# Altium PCB Driver_S_Comm.PcbDoc (part 5 of 5)
Units mm, origin at the board's own origin, x right, y up, seen from the top; angles counter-clockwise.
Board outline 200.2 x 290.2 mm, 2 copper layers (Top Layer, Bottom Layer), stack 1.371 mm thick; 518 components, 197 nets, 1403 pads, 323 vias.
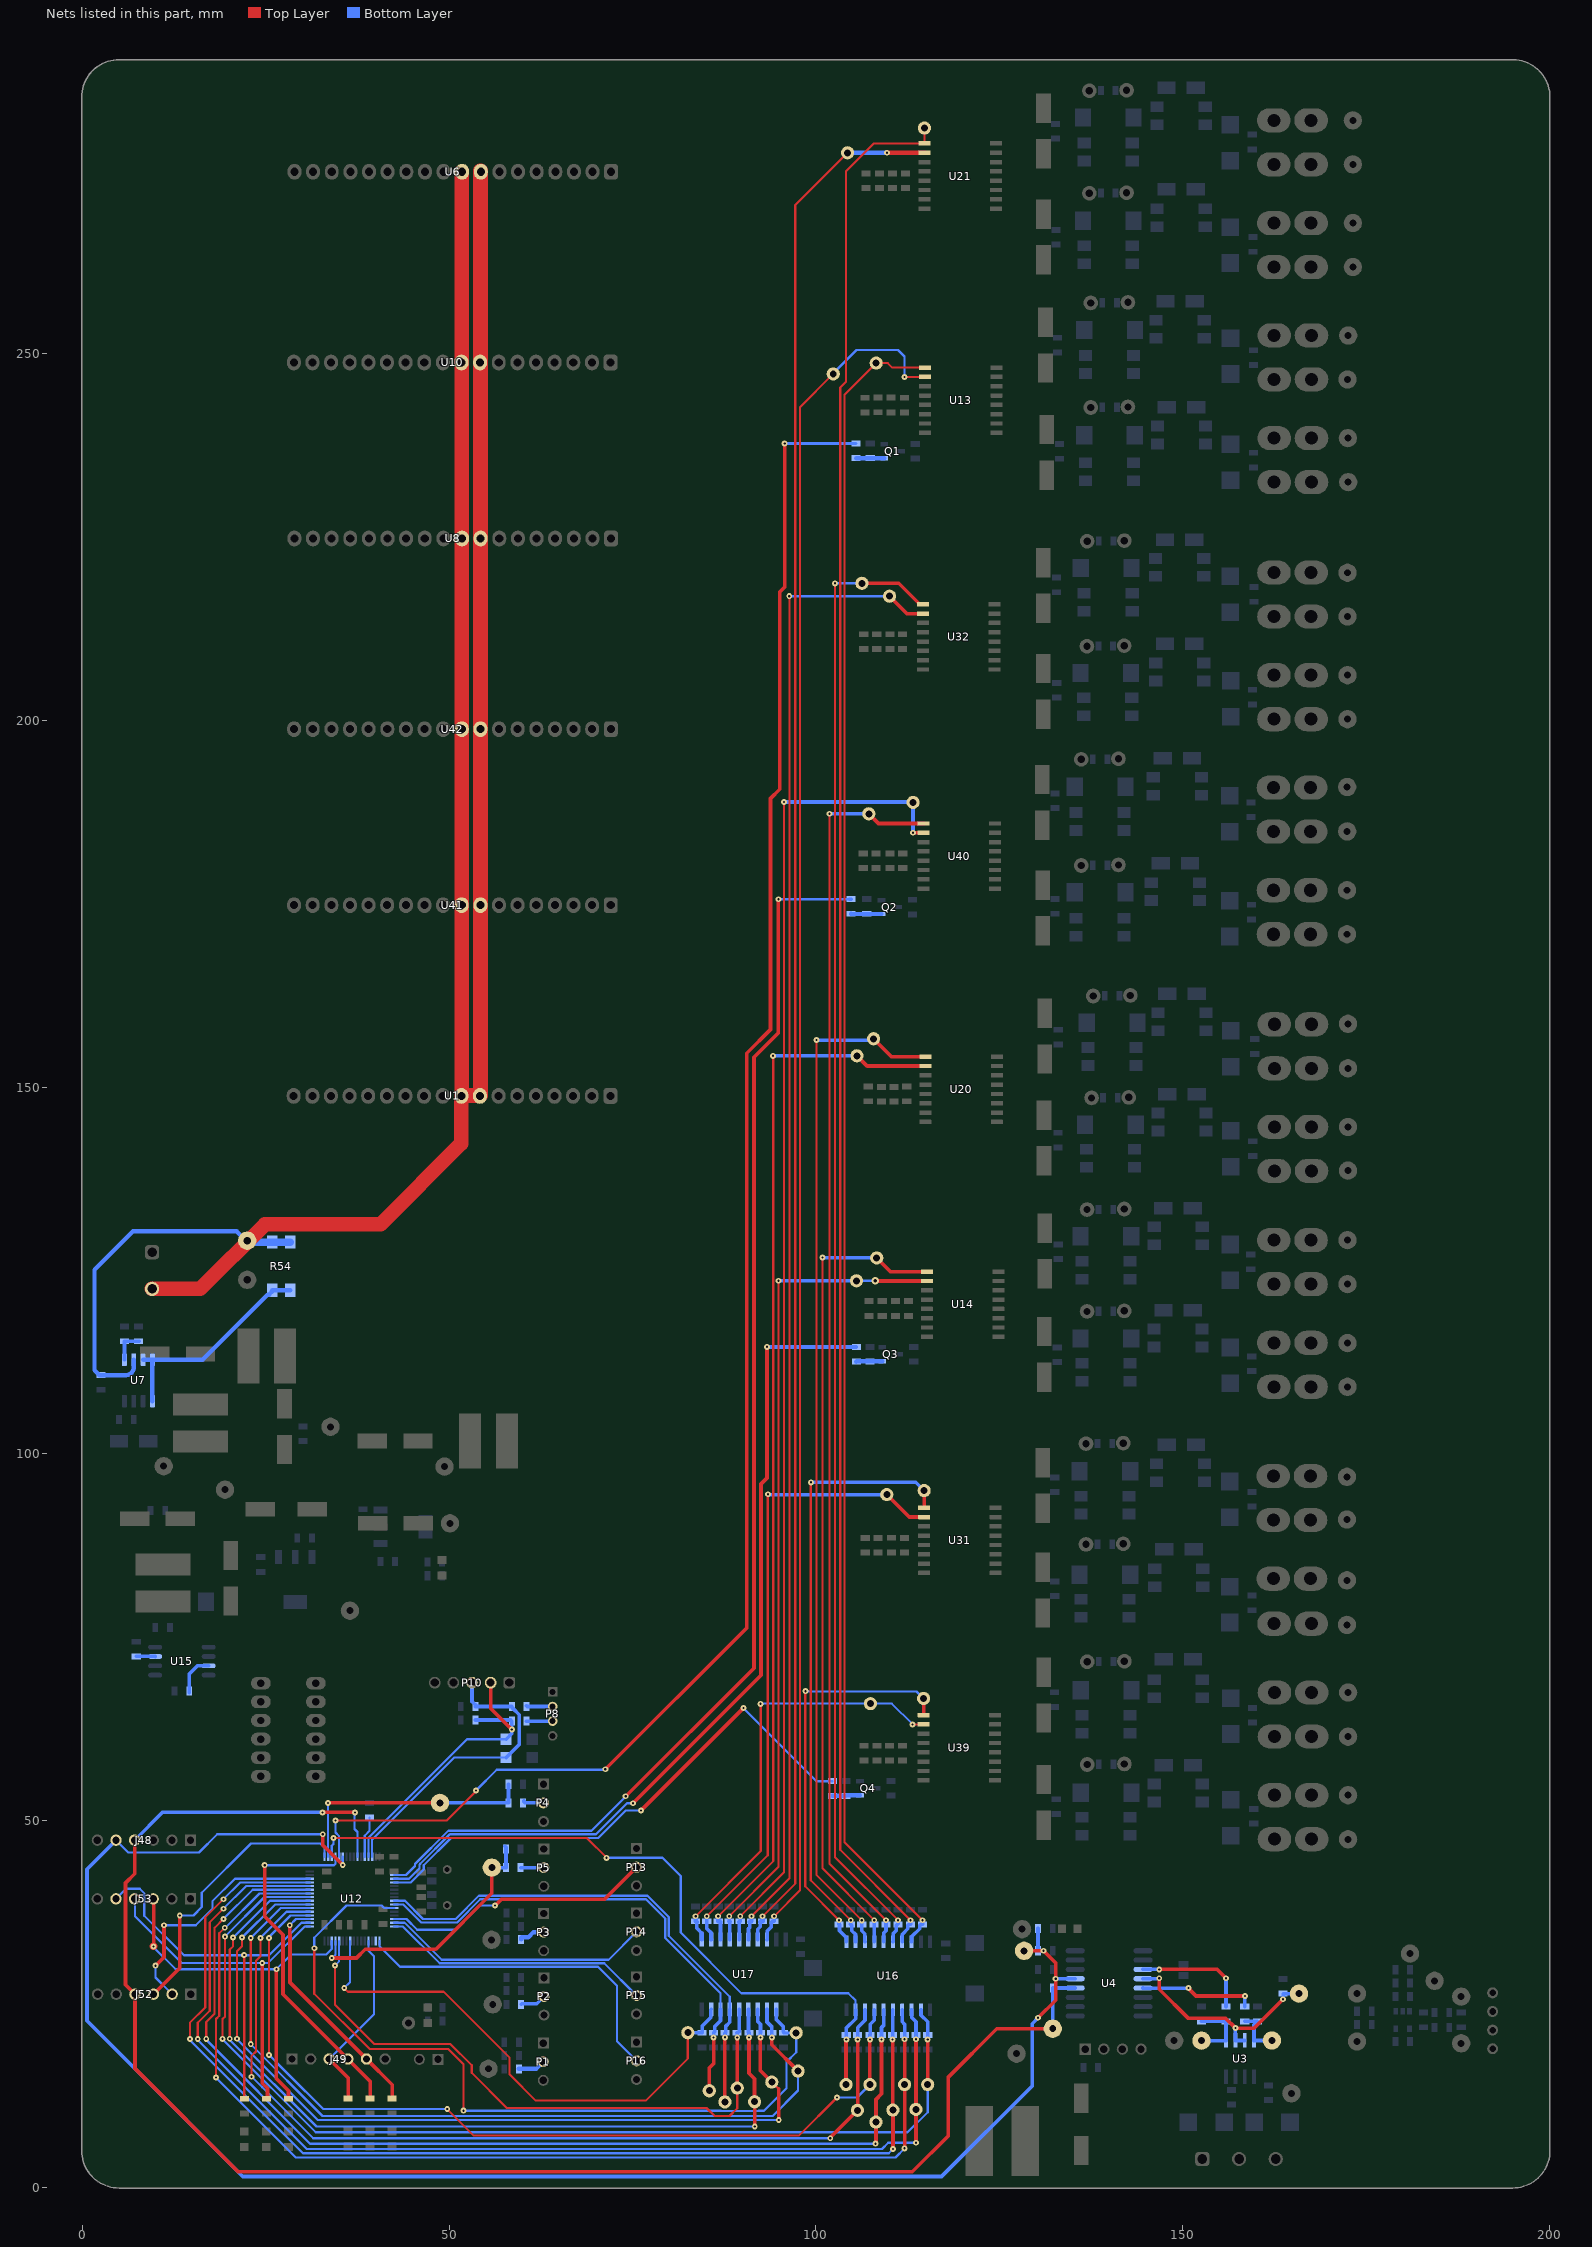
[diagram p4: the nets of this part, all layers, seen from the top]

## Via types
v1: diameter 1, hole 0.5, Top Layer to Bottom Layer, tented both sides, 118 vias
v2: diameter 0.8, hole 0.3, Top Layer to Bottom Layer, 112 vias
v3: diameter 0.8, hole 0.3, Top Layer to Bottom Layer, tented both sides, 64 vias
v4: diameter 2, hole 1, Top Layer to Bottom Layer, tented both sides, 11 vias
v5: diameter 1, hole 0.5, Top Layer to Bottom Layer, 9 vias
v6: diameter 0.8, hole 0.4, Top Layer to Bottom Layer, 5 vias
v7: diameter 0.8, hole 0.4, Top Layer to Bottom Layer, tented both sides, 2 vias
v8: diameter 0.7, hole 0.3, Top Layer to Bottom Layer, tented both sides, 1 vias
v9: diameter 1.5, hole 1, Top Layer to Bottom Layer, tented both sides, 1 vias

## Nets (pads, with @x,y where several pads share a name; then routed paths per layer and width w, separated by ;. In a path a pad name is that pad's centre, name@x,y a point inside that pad or via, vN(x,y) a via of type N, cw(c..) or ccw(c..) an arc to the next point about the centre after c; other vN are vias at no path point) (continued)
NetJ48_4: J48.4 J52.4 R28.1 TP11.1 U4.4 U12.58 | length 222.5
  Top Layer w0.5: J48.4@7.127,47.332 7.127,42.752 5.882,41.507 5.882,27.612 J52.4@7.162,26.332 7.162,16.188 21.225,2.125 113.15,2.125 118.075,7.05 118.075,15.05 124.653,21.628 TP11.1@132.303,21.628 ; v3(32.732,51.125) v3(37.15,51.125)
  Bottom Layer w0.3: v3(37.15,51.125) 37.107,51.082 37.107,48.857 37.507,48.457 U12.58@37.507,45.076
  Bottom Layer w0.5: J48.4@7.127,47.332 10.92,51.125 v3(32.732,51.125) ; TP11.1@132.225,21.55 TP11.1@132.303,21.628 R28.1@132.303,27.172 U4.4@135.368,27.172
NetJ48_5: J48.5 R39.2 R40.2 TP10.1 U4.5 U12.54 | length 234.9
  Top Layer w0.5: v3(32.771,48.146) 32.75,48.125 32.75,46.7 v3(35.5,43.95) ; TP10.1@128.397,32.252 v3(131.033,32.252) 132.703,30.582 v3(132.703,28.442) 132.703,25.515 v2(130.303,23.115)
  Bottom Layer w0.3: J48.5@4.587,47.332 6.269,45.65 15.9,45.65 18.396,48.146 v3(32.771,48.146) ; v3(35.5,43.95) 35.505,43.955 35.505,45.074 U12.54@35.507,45.076
  Bottom Layer w0.5: J48.5@4.587,47.332 0.632,43.377 0.632,22.718 21.875,1.475 117.15,1.475 129.5,13.825 129.5,22.312 v2(130.303,23.115) ; R39.2@130.303,35.287 R40.2@130.303,32.252 v3(131.033,32.252) ; v3(132.703,28.442) U4.5@135.368,28.442
NetJ49_3: J49.3 R12.2 U12.20 | length 25.4
  Top Layer w0.5: J49.3@33.657,17.496 36.257,14.896 R12.2@36.257,12.101
  Bottom Layer w0.3: J49.3@33.657,17.496 39.757,23.596 39.757,31.526 39.009,32.273 39.009,33.574 U12.20@39.007,33.576
NetJ49_4: J49.4 R11.2 U12.52 | length 48.5
  Top Layer w0.5: v2(24.85,43.925) 24.85,36.943 27.35,34.443 27.35,26.343 J49.4@36.197,17.496 39.257,14.436 R11.2@39.257,12.101
  Bottom Layer w0.3: v2(24.85,43.925) 34.306,43.925 34.507,44.126 U12.52@34.507,45.076
NetJ49_5: J49.5 R10.2 U12.35 | length 32.5
  Top Layer w0.5: v3(28.275,35.728) 28.275,34.479 28.305,34.449 28.305,27.928 J49.5@38.737,17.496 42.257,13.976 R10.2@42.257,12.101
  Bottom Layer w0.3: v3(28.275,35.728) 29.123,36.576 U12.35@31.007,36.576
NetJ52_2: J52.2 U12.46 | length 33.9
  Top Layer w0.5: v2(9.975,30.225) 11.125,31.375 v2(11.125,35.725)
  Bottom Layer w0.3: v2@9.975,30.199 9.975,28.599 J52.2@12.242,26.332 ; v2(11.125,35.725) 15.475,35.725 17.725,37.975 17.725,39 20.801,42.076 U12.46@31.007,42.076
NetJ52_3: J52.3 U12.49 | length 38.6
  Top Layer w0.5: J52.3@9.702,26.332 13.275,29.905 v3(13.275,37.075)
  Bottom Layer w0.3: v3(13.275,37.075) 15.15,37.075 16.287,38.212 16.287,40.162 23,46.875 32.435,46.875 33.007,46.303 U12.49@33.007,45.076
NetJ53_3: J53.3 R7.2 U12.30 | length 52.8
  Top Layer w0.5: v3@9.717,32.892 J53.3@9.717,39.272 ; v3(26.447,29.732) 26.447,14.826 28.107,13.166 R7.2@28.107,12.076
  Top Layer w1: J53.3@9.657,39.332 J53.3@9.717,39.272 ; v3(9.675,32.85) v3@9.717,32.892
  Bottom Layer w0.3: v3(9.675,32.85) 9.675,32.775 12.718,29.732 24.935,29.732 v3(26.447,29.732) 28.465,31.75 33.25,31.75 34.007,32.507 U12.30@34.007,33.576
NetJ53_4: J53.4 R8.2 U12.33 | length 49.9
  Top Layer w0.5: v3(24.529,30.607) 24.529,14.198 25.232,13.495 25.232,12.226 R8.2@25.081,12.076
  Top Layer w1: J53.4@7.117,39.332 J53.4@7.177,39.272
  Bottom Layer w0.3: J53.4@7.117,39.332 7.177,39.272 7.177,36.948 13.518,30.607 25.332,30.607 30.299,35.574 31.005,35.574 U12.33@31.007,35.576
NetJ53_5: J53.5 R9.2 U12.34 | length 54.2
  Top Layer w0.3: R9.2@22.057,12.126 v3(22.057,31.682)
  Top Layer w0.5: R9.2@22.032,12.076 22.032,12.126 R9.2@22.081,12.076
  Top Layer w1: J53.5@4.577,39.332 J53.5@4.637,39.272
  Bottom Layer w0.3: J53.5@4.577,39.332 5.945,40.7 7.825,40.7 8.447,40.078 8.447,37.028 13.843,31.632 22.007,31.632 v3(22.057,31.682) 22.107,31.632 25.432,31.632 29.876,36.076 U12.34@31.007,36.076
NetP1_2: P1.2 R1.1 | length 3.7
  Bottom Layer w0.6: R1.1@59.511,16.147 61.862,16.147 P1.2@62.842,17.127
NetP2_2: P2.2 R2.1 | length 3.6
  Bottom Layer w0.5: R2.1@59.826,24.951 59.91,25.035 61.951,25.035 P2.2@62.943,26.027
NetP3_2: P3.2 R3.1 | length 3.6
  Bottom Layer w0.6: R3.1@59.823,33.784 59.823,34.009 59.923,34.109 60.809,34.109 61.502,34.802 P3.2@62.893,34.802
NetP4_2: P4.2 R22.1 | length 2.9
  Bottom Layer w0.5: R22.1@60.207,52.699 60.207,52.571 60.357,52.421 P4.2@62.867,52.421
NetP5_2: P5.2 R23.1 | length 3.2
  Bottom Layer w0.5: R23.1@59.757,43.591 P5.2@62.917,43.591
NetP8_2: P8.2 R122.2 | length 3.6
  Bottom Layer w0.5: R122.2@60.552,65.661 60.652,65.561 P8.2@64.122,65.561
NetP8_3: P8.3 R123.2 | length 3.6
  Bottom Layer w0.5: R123.2@60.552,63.561 P8.3@64.122,63.561
NetP10_2: P10.2 R121.1 R123.1 U12.61 VD18.1 | length 42.3
  Top Layer w0.5: P10.2@55.662,68.807 55.662,65.298 v3(58.552,62.407)
  Bottom Layer w0.3: U12.61@39.007,45.076 39.007,47.67 52.439,61.101 VD18.1@57.774,61.101
  Bottom Layer w0.5: R121.1@53.592,63.711 58.402,63.711 R123.1@58.552,63.561 ; VD18.1@57.774,61.101 58.552,61.879 v3(58.552,62.407) R123.1@58.552,63.561
NetP10_3: P10.3 R120.1 R122.1 U12.62 VD1.1 | length 41.4
  Bottom Layer w0.3: U12.62@39.507,45.076 39.507,47.434 50.684,58.611 VD1.1@57.774,58.611
  Bottom Layer w0.5: P10.3@53.122,68.807 53.122,66.229 53.415,65.936 53.442,65.936 53.592,65.786 R120.1@53.592,65.561 ; R120.1@53.592,65.561 R122.1@58.552,65.561 ; VD1.1@57.774,58.611 59.552,60.389 59.552,64.436 R122.1@58.702,65.286
NetP13_2: P13.2 U12.14 | length 37.2
  Top Layer w0.5: v3(56.275,38.425) 57.131,39.281 71.186,39.281 P13.2@75.555,43.65
  Bottom Layer w0.3: U12.14@42.507,36.576 44.184,36.576 45.649,35.111 50.836,35.111 54.15,38.425 v3(56.275,38.425)
NetP14_2: P14.2 U12.15 | length 36.7
  Bottom Layer w0.3: U12.15@42.507,36.076 43.938,36.076 48.982,31.032 71.752,31.032 P14.2@75.555,34.835
NetP15_2: P15.2 U12.16 | length 36.9
  Bottom Layer w0.3: U12.16@42.507,35.576 43.688,35.576 48.712,30.552 71.168,30.552 P15.2@75.555,26.165
NetP16_2: P16.2 U12.17 | length 46.7
  Bottom Layer w0.3: U12.17@40.507,33.576 40.509,33.574 40.509,32.866 43.303,30.072 70.292,30.072 72.88,27.484 72.88,19.925 P16.2@75.555,17.25
NetQ1_1: Q1.1 R84.2 R88.1 | length 3.8
  Bottom Layer w0.6: R84.2@105.494,235.77 Q1.1@109.325,235.77
NetQ2_1: Q2.1 R111.2 R113.1 | length 4.2
  Bottom Layer w0.6: R111.2@104.803,173.643 104.833,173.613 Q2.1@108.955,173.613
NetQ3_1: Q3.1 R140.2 R143.1 | length 3.5
  Bottom Layer w0.6: R140.2@105.53,112.575 105.58,112.625 Q3.1@109.04,112.625
NetQ4_1: Q4.1 R157.2 R159.1 | length 3.8
  Bottom Layer w0.6: R157.2@102.275,53.38 R159.1@104.105,53.38 104.175,53.45 Q4.1@106.025,53.45
NetR13_2: R13.2 U15.7 | length 2.6
  Bottom Layer w0.5: R13.2@7.35,72.397 9.898,72.397 U15.7@9.918,72.377
NetR14_2: R14.2 U15.3 | length 5.6
  Bottom Layer w0.5: R14.2@14.568,67.465 14.568,69.982 15.693,71.107 U15.3@17.218,71.107
NetR15_2: R15.2 TP4.1 U12.51 U16.9 | length 99.5
  Top Layer w0.3: v2(34.237,47.625) 68.775,47.625 v2(71.475,44.925)
  Top Layer w0.5: TP4.1@104.125,14.011 v2@104.125,20.115
  Bottom Layer w0.3: U12.51@34.007,45.076 34.007,46.582 34.233,46.808 34.233,47.621 v2(34.237,47.625) ; v2(71.475,44.925) 79.1,44.925 81.575,42.45 81.575,34.75 89.85,26.475 104.435,26.475 105.43,25.48 U16.9@105.43,24.2
  Bottom Layer w0.5: v2(104.16,20.15) R15.2@104.16,20.775 104.16,21.731 105.43,23.001 U16.9@105.43,24.2
NetR16_2: R16.2 TP12.1 U12.37 U16.8 | length 129.5
  Top Layer w0.3: v2(23.075,15.075) 23.075,17.925 23.68,18.53 23.68,30.912 24.3,31.532 v2(24.3,34) ; v2(101.975,6.685) v2@101.975,6.8
  Top Layer w0.5: v2@101.975,6.8 TP12.1@105.675,10.5 105.705,10.53 v2(105.705,20.15)
  Bottom Layer w0.3: v2(23.075,15.075) 24.504,13.646 24.529,13.646 31.49,6.685 v2(101.975,6.685) ; v2(24.3,34) 24.3,34.05 27.826,37.576 U12.37@31.007,37.576
  Bottom Layer w0.5: v2(105.705,20.15) R16.2@105.705,20.775 105.705,21.78 106.7,22.775 U16.8@106.7,24.2
NetR17_2: R17.2 TP15.1 U12.36 U16.7 | length 122.7
  Top Layer w0.3: v2(25.432,34) 25.432,18.07 v2(25.442,18.06) ; v2(49.75,10.675) 49.75,10.648 53.348,7.05 97.675,7.05 v2(102.875,12.25)
  Top Layer w0.5: TP15.1@107.375,14.011 v2(107.375,20.15)
  Bottom Layer w0.3: v2(25.432,34) 25.432,34.134 28.374,37.076 U12.36@31.007,37.076 ; v2(25.442,18.06) 28.175,15.327 32.827,10.675 v2(49.75,10.675) ; v2(102.875,12.25) 105.614,12.25 TP15.1@107.375,14.011
  Bottom Layer w0.5: v2(107.375,20.15) R17.2@107.375,20.775 107.425,20.825 107.425,22.25 107.97,22.795 U16.7@107.97,24.2
NetR18_2: R18.2 TP17.1 U12.43 U16.6 | length 146.7
  Top Layer w0.3: v2(16.882,20.246) 16.882,22.553 18.03,23.701 18.03,35.387 v2(19.225,36.582) ; v2(108.15,5.955) v2@108.2,6.005
  Top Layer w0.5: v2@108.2,6.005 TP17.1@108.2,8.9 108.2,11.989 108.965,12.754 v2(108.965,20.15)
  Bottom Layer w0.3: v2(16.882,20.246) 16.978,20.15 16.978,20.011 31.034,5.955 v2(108.15,5.955) ; v2(19.225,36.582) 23.219,40.576 U12.43@31.007,40.576
  Bottom Layer w0.5: v2(108.965,20.15) R18.2@108.965,20.775 ; R18.2@108.965,20.775 108.965,21.78 109.24,22.055 U16.6@109.24,24.2
NetR19_2: R19.2 TP18.1 U12.45 U16.5 | length 155.3
  Top Layer w0.3: v2(14.657,20.221) 14.657,22.433 16.748,24.525 16.748,36.81 v2(19.225,39.287)
  Top Layer w0.5: v2(110.475,20.15) 110.475,10.575 TP18.1@110.512,10.537 v2(110.512,5.225)
  Bottom Layer w0.3: v2(14.657,20.221) 14.657,20.085 14.889,19.854 14.889,19.85 30.089,4.65 109.937,4.65 v2(110.512,5.225) ; v2(19.225,39.287) 21.514,41.576 U12.45@31.007,41.576
  Bottom Layer w0.5: v2(110.475,20.15) 110.51,20.185 U16.5@110.51,24.2
NetR20_2: R20.2 TP19.1 U12.42 U16.4 | length 152.4
  Top Layer w0.3: v2(18.225,14.975) 18.225,22.95 18.65,23.375 18.65,34.64 v2(19.41,35.4)
  Top Layer w0.5: v2(112.105,5.317) TP19.1@112.105,14.011 v2(112.105,20.185)
  Bottom Layer w0.3: v2(18.225,14.975) 18.225,14.95 29.1,4.075 110.864,4.075 v2(112.105,5.317) ; v2(19.41,35.4) 19.468,35.4 24.144,40.076 U12.42@31.007,40.076
  Bottom Layer w0.5: U16.4@111.78,24.2 111.78,22.575 112.105,22.25 R20.2@112.105,20.775 v2(112.105,20.185)
NetR21_2: R21.2 TP27.1 U12.44 U16.3 | length 155.2
  Top Layer w0.3: v2(15.732,20.221) 15.732,22.432 17.375,24.075 17.375,36.125 v2(19.225,37.975)
  Top Layer w0.5: v2(113.65,6.075) TP27.1@113.65,10.625 v2(113.65,20.185)
  Bottom Layer w0.3: v2(15.732,20.221) 15.732,20.085 15.964,19.854 15.964,19.85 30.589,5.225 109.025,5.225 109.875,6.075 v2(113.65,6.075) ; v2(19.225,37.975) 22.326,41.076 U12.44@31.007,41.076
  Bottom Layer w0.5: U16.3@113.05,24.2 113.075,24.175 113.075,23.15 113.65,22.575 R21.2@113.65,20.775 v2(113.65,20.185)
NetR22_2: R22.2 R29.2 TP8.1 U12.50 | length 34.7
  Top Layer w0.5: v3(33.507,52.407) 33.521,52.421 TP8.1@48.044,52.421
  Bottom Layer w0.3: U12.50@33.507,45.076 v3(33.507,52.407)
  Bottom Layer w0.5: TP8.1@48.199,52.421 R22.2@58.087,52.421 R29.2@58.087,54.961 ; TP8.1@48.334,52.421 TP8.1@48.439,52.421 ; TP8.1@48.438,52.423 TP8.1@48.439,52.421 ; TP8.1@48.75,52.421 TP8.1@48.439,52.421
NetR23_2: R23.2 R30.2 TP7.1 U12.29 | length 36.4
  Top Layer w0.5: v3(34.007,31.275) 37.371,31.275 38.571,32.475 48.2,32.475 55.823,40.098 TP7.1@55.823,43.591
  Bottom Layer w0.3: v3(34.007,31.275) 34.059,31.275 34.507,31.723 U12.29@34.507,33.576
  Bottom Layer w0.5: TP7.1@55.823,43.591 R23.2@57.757,43.591 R30.2@57.757,46.131 57.757,46.356 R30.2@57.607,46.506
NetR26_1: R26.1 R32.1 TP9.1 U3.4 | length 6.9
  Bottom Layer w0.5: R32.1@158.477,22.632 R26.1@159.982,22.632 ; R26.1@160.207,22.632 R26.1@159.982,22.632 ; TP9.1@162.184,20.027 U3.4@159.747,20.027 159.747,22.172 159.832,22.257 159.832,22.482 R26.1@159.982,22.632
NetR27_1: R27.1 R36.1 TP16.1 U3.1 | length 9.3
  Bottom Layer w0.5: TP16.1@152.592,20.002 155.922,20.002 155.937,20.017 U3.1@155.937,20.027 R36.1@155.937,22.632 R27.1@152.592,22.632
NetR31_2: R31.2 TP31.1 U12.41 U16.2 | length 144.8
  Top Layer w0.3: v2(19.115,20.246) 19.115,22.94 19.425,23.25 v2(19.425,34.175)
  Top Layer w0.5: TP31.1@115.25,14.011 v2(115.25,20.15)
  Bottom Layer w0.3: v2(19.115,20.246) 19.115,20.198 19.793,19.52 31.813,7.5 112.514,7.5 115.25,10.237 TP31.1@115.25,14.011 ; v2(19.425,34.175) 24.826,39.576 U12.41@31.007,39.576
  Bottom Layer w0.5: U16.2@114.32,24.2 114.345,24.175 114.345,23.48 115.25,22.575 v2(115.25,20.15)
NetR32_2: R32.2 U4.13 | length 15.8
  Top Layer w0.5: v3(150.822,27.172) 150.822,27.094 151.839,26.077 v3(158.497,26.077)
  Bottom Layer w0.5: U4.13@144.618,27.172 144.64,27.15 150.8,27.15 v3(150.822,27.172) ; R32.2@158.477,24.632 158.477,26.057 v3(158.497,26.077)
NetR33_2: R33.2 TP37.1 U16.11 U39.1 | length 55.3
  Top Layer w0.3: v2(98.58,67.65) 98.55,67.62 98.55,41.04 v2(103.17,36.42)
  Top Layer w0.5: U39.1@114.699,64.39 TP37.1@114.699,66.652
  Bottom Layer w0.3: v2(98.58,67.65) 98.617,67.613 113.738,67.613 TP37.1@114.699,66.652
  Bottom Layer w0.5: v2(103.17,36.42) R33.2@103.17,35.851 103.219,35.801 103.219,34.994 104.113,34.1 104.135,34.1 104.16,34.075 U16.11@104.16,33.5
NetR34_2: R34.2 TP38.1 U16.12 U31.1 | length 83.2
  Top Layer w0.3: v2(99.345,96.125) 99.31,96.09 99.31,41.866 v2(104.756,36.42)
  Top Layer w0.5: U31.1@114.769,92.66 TP38.1@114.769,94.997
  Bottom Layer w0.5: v2(99.345,96.125) 113.641,96.125 TP38.1@114.769,94.997 ; R34.2@104.725,35.851 104.741,35.866 104.741,36.405 v2(104.756,36.42) ; R34.2@104.906,35.701 104.906,34.994 105.405,34.495 105.405,33.525 U16.12@105.43,33.5
NetR35_2: R35.2 TP40.1 U16.13 U20.1 | length 141.6
  Top Layer w0.3: v2(100.075,156.425) 100.075,42.6 v2(106.27,36.405)
  Top Layer w0.5: TP40.1@107.875,156.6 110.321,154.154 U20.1@114.939,154.154
  Bottom Layer w0.3: v2(100.075,156.425) v2@100.106,156.394 ; TP40.1@107.669,156.394 TP40.1@107.875,156.6
  Bottom Layer w0.5: v2@100.106,156.394 TP40.1@107.669,156.394 ; v2(106.27,36.405) R35.2@106.27,35.851 106.27,34.992 106.675,34.587 106.675,33.525 U16.13@106.7,33.5
NetR36_2: R36.2 U4.11 | length 15.7
  Top Layer w0.5: v2(146.825,29.712) 154.73,29.712 v3(155.937,28.504)
  Bottom Layer w0.5: U4.11@144.618,29.712 v2(146.825,29.712) ; R36.2@155.937,24.632 v3(155.937,28.504)
NetR37_2: R37.2 TP41.1 U14.1 U16.14 | length 111.2
  Top Layer w0.3: v2(100.925,126.775) 100.925,43.465 v2(107.97,36.42)
  Top Layer w0.5: TP41.1@108.303,126.725 110.179,124.849 U14.1@115.141,124.849
  Bottom Layer w0.3: v2(100.925,126.775) v2@100.975,126.725
  Bottom Layer w0.5: v2@100.975,126.725 TP41.1@108.303,126.725 ; U16.14@107.97,33.5 v2(107.97,36.42)
NetR38_2: R38.2 TP13.1 U3.2 U3.3 U4.12 | length 30.6
  Top Layer w0.5: v2(146.825,28.5) 146.825,27.015 150.808,23.032 155.887,23.032 v3(157.207,21.712) 159.778,21.712 v3(163.712,25.646)
  Bottom Layer w0.5: U4.12@144.618,28.442 146.686,28.442 146.744,28.5 v2(146.825,28.5) ; v3(157.207,21.712) U3.2@157.207,20.027 U3.3@158.477,20.027 ; v3(163.712,25.646) 163.712,26.412 TP13.1@166.186,26.412
NetR42_2: R42.2 TP42.1 U16.15 U40.1 | length 171
  Top Layer w0.3: v2(101.87,187.275) 101.87,44.13 v2(109.58,36.42)
  Top Layer w0.5: TP42.1@107.225,187.275 108.541,185.959 U40.1@114.678,185.959
  Bottom Layer w0.3: TP42.1@107.225,187.275 TP42.1@107.597,186.903
  Bottom Layer w0.5: v2(101.87,187.275) TP42.1@107.225,187.275 ; U16.15@109.24,33.5 109.242,33.502 109.242,34.654 109.58,34.992 R42.2@109.58,35.851 v2(109.58,36.42)
NetR43_2: R43.2 TP43.1 U16.16 U32.1 | length 202.3
  Top Layer w0.3: v2(102.595,218.7) 102.6,218.695 102.6,45.045 v2(111.225,36.42)
  Top Layer w0.5: TP43.1@106.292,218.7 111.318,218.7 114.05,215.968 114.05,215.889 114.1,215.839 U32.1@114.625,215.839
  Bottom Layer w0.3: v2(102.595,218.7) TP43.1@106.292,218.7
  Bottom Layer w0.5: U16.16@110.51,33.5 110.535,33.525 110.535,34.59 110.968,35.022 110.968,35.701 111.225,35.958 v2(111.225,36.42)
NetR44_2: R44.2 TP46.1 U16.17 U21.1 | length 260.7
  Top Layer w0.3: v2(112.915,36.42) 103.325,46.01 103.325,245.4 104.125,246.2 104.125,274.9 107.903,278.678 U21.1@114.815,278.678 TP46.1@114.815,280.779
  Bottom Layer w0.5: U16.17@111.78,33.5 111.805,33.525 111.805,34.507 112.54,35.242 112.54,35.701 112.69,35.851 R44.2@112.915,35.851 v2(112.915,36.42)
NetR45_2: R45.2 TP47.1 U13.1 U16.18 | length 228.4
  Top Layer w0.3: TP47.1@107.747,248.265 103.925,244.443 103.925,47.029 v2(114.534,36.42) ; TP47.1@108.225,248.725 109.825,248.725 110.437,248.113 U13.1@114.887,248.113
  Bottom Layer w0.5: U16.18@113.05,33.5 113.075,33.525 113.075,34.19 114.159,35.274 114.159,35.701 114.309,35.851 R45.2@114.534,35.851 v2(114.534,36.42)
NetR46_2: R46.2 TP48.1 U12.25 U17.9 | length 72.9
  Top Layer w0.3: v2(35.7,27.175) 36.2,26.675 49.25,26.675 58.25,17.675 58.25,15.381 61.806,11.825 76.825,11.825 82.55,17.55 TP48.1@82.55,21.08
  Bottom Layer w0.3: v2(35.7,27.175) 35.7,27.2 36.507,28.007 U12.25@36.507,33.576
  Bottom Layer w0.5: TP48.1@82.55,21.08 82.555,21.075 R46.2@84.49,21.075 84.495,21.07 84.495,21.97 85.68,23.155 85.68,24.225 U17.9@85.73,24.275
NetR47_2: R47.2 TP50.1 U12.10 U17.8 | length 68
  Top Layer w0.5: TP50.1@85.475,12.814 85.475,16.275 86.065,16.865 v2(86.065,20.433)
  Bottom Layer w0.3: U12.10@42.507,38.576 43.763,38.576 46.219,36.12 51.098,36.12 54.26,39.281 76.844,39.281 79.475,36.65 79.475,34 87,26.475 U17.8@87,24.275
  Bottom Layer w0.5: v2(86.065,20.433) R47.2@86.065,21.07 86.202,21.207 86.202,21.927 87,22.725 U17.8@87,24.275
NetR48_2: R48.2 TP53.1 U12.9 U17.7 | length 70.5
  Top Layer w0.5: TP53.1@87.6,11.326 TP53.1@87.6,11.65 ; TP53.1@87.6,11.363 v2@87.6,20.431
  Bottom Layer w0.3: U12.9@42.507,39.076 43.975,39.076 46.451,36.6 50.9,36.6 54.061,39.761 77.043,39.761 79.955,36.849 79.955,34.295 88.27,25.98 U17.7@88.27,24.275
  Bottom Layer w0.5: v2(87.62,20.451) 87.62,20.993 87.697,21.07 87.697,21.927 88.27,22.5 U17.7@88.27,24.275
NetR54_2: R54.2 U7.1 U7.7 U7.8 | length 29.7
  Bottom Layer w0.6: U7.7@8.275,112.834 U7.8@9.545,112.834 ; U7.1@9.545,107.184 U7.8@9.545,112.834 ; R54.2@25.875,122.325 R54.2@28.325,122.325 ; R54.2@25.963,122.237 25.45,121.725 25.275,121.725 16.384,112.834 U7.8@9.545,112.834
NetR56_2: R56.2 R57.2 U7.5 | length 4.5
  Bottom Layer w0.5: U7.5@5.74,112.839 R57.2@5.74,115.369 R56.2@7.734,115.369
NetR59_2: R59.2 U12.60 | length 5.6
  Bottom Layer w0.3: U12.60@38.507,45.076 38.507,47.957 39.159,48.609 R59.2@39.159,50.407
NetR66_2: R66.2 TP54.1 U12.28 U17.6 | length 84.4
  Top Layer w0.3: v2(34.45,30.25) 34.45,24.875 39.774,19.551 50.168,19.551 53.075,16.644 53.075,15.625 57.875,10.825 85.105,10.825 86.205,9.725 88.221,9.725 89.291,10.796 TP54.1@89.291,13.536
  Top Layer w0.5: TP54.1@89.291,13.536 v2(89.291,20.434)
  Bottom Layer w0.3: v2(34.45,30.25) 35.007,30.807 U12.28@35.007,33.576
  Bottom Layer w0.5: R66.2@89.255,21.07 89.273,21.052 89.273,20.451 v2(89.291,20.434) ; R66.2@89.54,21.22 U17.6@89.54,24.275
NetR67_2: R67.2 TP57.1 U12.40 U17.5 | length 119.5
  Top Layer w0.3: v2(20.095,20.25) 20.095,32.42 20.55,32.875 v2(20.55,34.05) ; TP57.1@91.65,11.675 TP57.1@91.675,11.65
  Top Layer w0.5: v2(90.896,20.433) 90.896,15.57 91.65,14.816 TP57.1@91.65,11.675 ; v2(91.675,8.29) TP57.1@91.675,11.65
  Bottom Layer w0.3: v2(20.095,20.25) 20.095,20.115 20.2,20.01 20.2,20 31.91,8.29 v2(91.675,8.29) ; v2(20.55,34.05) 25.576,39.076 U12.40@31.007,39.076
  Bottom Layer w0.5: U17.5@90.81,24.275 90.81,21.156 R67.2@90.896,21.07 v2(90.896,20.433)
NetR68_2: R68.2 TP58.1 U12.39 U17.4 | length 120
  Top Layer w0.3: v2(21.075,20.25) 21.075,32.2 21.75,32.875 v2(21.75,34.05) ; TP58.1@94,14.35 94.95,13.4
  Top Layer w0.5: v2(92.441,20.433) 92.441,15.909 TP58.1@94,14.35 ; v2(94.95,9.175) 94.95,13.4
  Bottom Layer w0.3: v2(21.075,20.25) 21.075,20.175 32.075,9.175 v2(94.95,9.175) ; v2(21.75,34.05) 26.276,38.576 U12.39@31.007,38.576
  Bottom Layer w0.5: U17.4@92.08,24.275 92.08,22.621 92.451,22.25 92.451,21.08 R68.2@92.441,21.07 92.451,21.06 92.441,21.05 v2(92.441,20.433)
NetR69_2: R69.2 TP59.1 U12.38 U17.3 | length 117.2
  Top Layer w0.3: v2(22.95,19.52) v2(22.95,34)
  Top Layer w0.5: v2(94,20.433) 94,19.429 TP59.1@97.575,15.854
  Bottom Layer w0.3: v2(22.95,19.52) 32.745,9.725 94.109,9.725 97.575,13.191 TP59.1@97.575,15.854 ; v2(22.95,34) 27.026,38.076 U12.38@31.007,38.076
  Bottom Layer w0.5: U17.3@93.35,24.275 93.35,22.55 93.973,21.927 93.973,21.22 94,21.193 R69.2@94,21.07 v2(94,20.433)
NetR70_2: R70.2 TP60.1 U12.11 U17.2 | length 109.9
  Top Layer w0.3: v3(31.626,32.598) 31.626,26.399 39.169,18.856 49.894,18.856 51.95,16.8 v2(51.95,10.455)
  Bottom Layer w0.3: v3(31.626,32.598) 31.626,34.043 36.007,38.424 40.796,38.424 40.992,38.228 41.144,38.076 U12.11@42.507,38.076 ; v2(51.95,10.455) 87.055,10.455 87.091,10.42 92.134,10.42 92.17,10.455 92.93,10.455 96,13.525 96,17.075 97.325,18.4 TP60.1@97.325,21.07
  Bottom Layer w0.4: R70.2@95.605,21.07 TP60.1@97.325,21.07
  Bottom Layer w0.5: U17.2@94.62,24.275 94.62,22.87 95.563,21.927 95.563,21.22 95.605,21.178 R70.2@95.605,21.07
NetR71_2: R71.2 TP61.1 U17.11 U39.2 | length 59.6
  Top Layer w0.3: v2(83.617,36.961) 92.5,45.844 92.5,65.9 v2(92.475,65.925) ; v2(113.198,63.12) U39.2@114.699,63.12
  Bottom Layer w0.3: v2(92.475,65.925) 92.5,65.95 110.368,65.95 v2(113.198,63.12)
  Bottom Layer w0.5: R71.2@83.765,36.165 83.765,35.345 U17.11@84.45,34.66
  Bottom Layer w0.58: v2(83.617,36.961) R71.2@83.617,36.275 83.655,36.275 R71.2@83.765,36.165 ; U17.11@84.45,34.66 84.45,33.785 U17.11@84.46,33.775
NetR78_2: R78.2 TP64.1 U17.12 U31.2 | length 87
  Top Layer w0.3: v2(85.13,36.961) 93.45,45.281 93.45,94.48 v2(93.47,94.5)
  Top Layer w0.5: TP64.1@109.675,94.45 112.735,91.39 U31.2@114.769,91.39
  Bottom Layer w0.5: v2(85.13,36.961) 85.13,35.301 U17.12@85.72,34.711 ; v2(93.47,94.5) 93.52,94.45 TP64.1@109.675,94.45
  Bottom Layer w0.58: U17.12@85.72,34.711 85.72,33.785 U17.12@85.73,33.775
NetR79_2: R79.2 TP65.1 U17.13 U20.2 | length 145.2
  Top Layer w0.3: v2(86.685,36.961) 94.2,44.475 94.2,154.25 v2(94.175,154.275)
  Top Layer w0.5: TP65.1@105.6,154.275 106.991,152.884 U20.2@114.939,152.884
  Bottom Layer w0.5: U17.13@87,33.775 R79.2@87,36.165 ; v2(94.175,154.275) TP65.1@105.6,154.275
  Bottom Layer w0.58: v2(86.685,36.961) R79.2@86.685,36.275 86.89,36.275 R79.2@87,36.165
NetR80_2: R80.2 TP66.1 U14.2 U17.14 | length 112.9
  Top Layer w0.3: v2(88.195,36.961) 94.925,43.691 94.925,123.595 v2(94.93,123.6)
  Top Layer w0.5: v5(108.1,123.6) 108.121,123.579 U14.2@115.141,123.579
  Bottom Layer w0.3: TP66.1@105.245,123.6 v5(108.1,123.6)
  Bottom Layer w0.5: R80.2@88.195,36.275 v2(88.195,36.961) ; U17.14@88.27,33.775 R80.2@88.27,36.2 ; v2(94.93,123.6) TP66.1@105.245,123.6
  Bottom Layer w0.58: R80.2@88.195,36.275 R80.2@88.27,36.2
NetR84_1: R84.1 U12.53 | length 245.5
  Top Layer w0.3: v2(34.507,50.007) 49.682,50.007 53.675,54 v2(53.675,54.1)
  Top Layer w0.5: v2(71.3,57) 90.572,76.272 90.572,154.622 93.825,157.875 93.825,189.375 95.075,190.625 95.075,217.525 95.75,218.2 v2(95.75,237.75)
  Bottom Layer w0.3: v2(34.507,50.007) 34.507,48.387 35.007,47.887 U12.53@35.007,45.076 ; v2(53.675,54.1) 56.5,56.925 71.225,56.925 v2(71.3,57)
  Bottom Layer w0.4: v2(95.75,237.75) 95.77,237.77 R84.1@105.494,237.77
NetR85_2: R85.2 TP71.1 U17.15 U40.2 | length 181.3
  Top Layer w0.3: v2(89.695,36.961) 95.675,42.941 95.675,188.872 v2(95.67,188.877) ; v2(113.26,184.7) v2@113.265,184.694 ; U40.2@114.672,184.694 U40.2@114.678,184.689
  Top Layer w0.5: v2@113.265,184.694 U40.2@114.672,184.694
  Bottom Layer w0.3: TP71.1@113.26,188.834 113.303,188.877 TP71.1@113.744,188.877
  Bottom Layer w0.5: U17.15@89.54,33.775 R85.2@89.54,36.165 ; R85.2@89.65,36.275 89.695,36.32 v2(89.695,36.961) ; v2(95.67,188.877) TP71.1@113.303,188.877 ; v2(113.26,184.7) TP71.1@113.26,188.834
  Bottom Layer w0.58: R85.2@89.54,36.165 R85.2@89.65,36.275
NetR89_2: R89.2 TP72.1 U17.16 U32.2 | length 204.8
  Top Layer w0.3: v2(91.231,36.961) 96.4,42.13 96.4,216.925 v2(96.375,216.95)
  Top Layer w0.5: TP72.1@110.05,216.95 112.431,214.569 U32.2@114.625,214.569
  Bottom Layer w0.3: v2(96.375,216.95) TP72.1@110.05,216.95
  Bottom Layer w0.5: U17.16@90.82,33.785 90.82,35.276 90.977,35.433 R89.2@90.977,36.165
  Bottom Layer w0.58: U17.16@90.81,33.775 U17.16@90.82,33.785 ; R89.2@90.977,36.165 91.087,36.275 R89.2@91.231,36.275 ; R89.2@91.231,36.275 v2(91.231,36.961)
NetR90_2: R90.2 TP73.1 U17.17 U21.2 | length 259.3
  Top Layer w0.3: v2(92.75,36.961) 97.2,41.411 97.2,270.275 TP73.1@104.325,277.4
  Top Layer w0.58: v2(109.725,277.4) 109.733,277.408 U21.2@114.815,277.408
  Bottom Layer w0.5: U17.17@92.08,33.775 92.08,35.18 92.415,35.515 R90.2@92.415,36.165
  Bottom Layer w0.58: R90.2@92.415,36.165 92.525,36.275 R90.2@92.75,36.275 v2(92.75,36.961) ; TP73.1@104.325,277.4 v2(109.725,277.4)
NetR97_2: R97.2 TP74.1 U13.2 U17.18 | length 234.3
  Top Layer w0.3: v2(94.32,36.961) 97.85,40.491 97.85,242.725 102.326,247.201 TP74.1@102.326,247.301 ; v2(112.1,246.825) 112.118,246.843 U13.2@114.887,246.843
  Bottom Layer w0.3: TP74.1@102.4,247.375 105.55,250.525 111.2,250.525 112.1,249.625 v2(112.1,246.825)
  Bottom Layer w0.5: U17.18@93.35,33.775 93.4,33.825 93.4,34.981 93.945,35.526 93.945,36.125 94.095,36.275 R97.2@94.32,36.275 v2(94.32,36.961)
NetR111_1: R111.1 U12.2 | length 177
  Top Layer w0.5: v3(74.075,53.325) 74.1,53.325 91.562,70.787 91.562,154.087 94.9,157.425 v2(94.9,175.625)
  Bottom Layer w0.3: U12.2@42.507,42.576 44.12,42.576 45.348,43.804 45.348,44.08 49.897,48.63 69.405,48.63 74.075,53.3 v3(74.075,53.325) ; v2(94.9,175.625) 104.56,175.625 R111.1@104.578,175.643
  Bottom Layer w0.5: R111.1@104.578,175.643 R111.1@104.803,175.643
NetR140_1: R140.1 U12.3 | length 119.1
  Top Layer w0.5: v3(75.075,52.375) 92.525,69.825 92.525,95.9 93.35,96.725 v2(93.35,114.6)
  Bottom Layer w0.3: U12.3@42.507,42.076 44.53,42.076 45.95,43.496 45.95,43.994 46.072,44.116 46.072,44.126 50.056,48.11 50.066,48.11 50.106,48.15 70.03,48.15 74.255,52.375 v3(75.075,52.375)
  Bottom Layer w0.5: v2(93.35,114.6) 93.375,114.575 R140.1@105.53,114.575
NetR157_1: R157.1 U12.4 | length 74.1
  Top Layer w0.5: v3(76.15,51.375) v2(90.125,65.35)
  Bottom Layer w0.3: U12.4@42.507,41.576 44.781,41.576 46.552,43.347 46.552,43.927 50.255,47.63 70.355,47.63 74.1,51.375 v3(76.15,51.375) ; v2(90.125,65.35) 100.095,55.38 R157.1@102.275,55.38
NetU12_18: U12.18
VCC: C41.1 C47.1 J9.2 R54.1 U1.8 U1.9 U6.8 U6.9 U7.6 U8.8 U8.9 U10.8 U10.9 U41.8 U41.9 U42.8 U42.9 | length 361.8
  Top Layer w2: J9.2@9.5,122.5 16.075,122.5 24.904,131.329 40.67,131.329 51.67,142.329 U1.9@51.67,148.815 ; U6.9@51.73,274.815 U42.9@51.73,198.815 51.73,148.875 54.27,148.875 U42.8@54.27,198.815 54.27,248.815 54.27,274.815 U6.8@54.27,274.942
  Bottom Layer w0.6: U7.6@7.005,112.834 7.005,111.789 cw(c5.965,111.789) 5.965,110.749 2.295,110.749 1.65,111.394 1.65,125.1 6.9,130.35 21.025,130.35 C47.1@22.475,128.9
  Bottom Layer w1: C47.1@22.475,128.9 22.5,128.875 R54.1@25.875,128.875 R54.1@28.325,128.875
pads on no net: C10.2 U1.5 U1.6 U1.7 U1.12 U1.13 U1.14 U4.3 U4.14 U6.5 U6.6 U6.7 U6.12 U6.13 U6.14 U8.5 U8.6 U8.7 U8.12 U8.13 U8.14 U10.5 U10.6 U10.7 U10.12 U10.13 U10.14 U13.7 U13.12 U13.13 U14.7 U14.12 U14.13 U20.7 U20.12 U20.13 U21.7 U21.12 U21.13 U31.7 U31.12 U31.13 U32.7 U32.12 U32.13 U39.7 U39.12 U39.13 U40.7 U40.12 U40.13 U41.5 U41.6 U41.7 U41.12 U41.13 U41.14 U42.5 U42.6 U42.7 U42.12 U42.13 U42.14

## Polygon pours and split planes (outlines as drawn)
GND on Bottom Layer "NONET_L-01_P-001" (solid, pour order 42): 115.92,281.845 115.92,279.882 115.92,268.876 113.729,266.686 104.789,266.686 104.789,281.845
GND on Bottom Layer "NONET_L-01_P-001" (solid, pour order 41): 115.89,250.091 115.89,248.127 115.89,237.121 113.7,234.931 104.759,234.931 104.759,250.091
GND on Bottom Layer "NONET_L-01_P-001" (solid, pour order 40): 115.87,219.945 115.87,217.982 115.87,206.976 113.679,204.786 104.739,204.786 104.739,219.945
GND on Bottom Layer "NONET_L-01_P-001" (solid, pour order 39): 115.97,187.97 115.97,186.007 115.97,175.001 113.779,172.811 104.839,172.811 104.839,187.97
GND on Bottom Layer "NONET_L-01_P-001" (solid, pour order 38): 115.92,157.52 115.92,155.557 115.92,144.551 113.729,142.361 104.789,142.361 104.789,157.52
GND on Bottom Layer "NONET_L-01_P-001" (solid, pour order 37): 116.12,127.345 116.12,125.382 116.12,114.376 113.929,112.186 104.989,112.186 104.989,127.345
GND on Bottom Layer "NONET_L-01_P-001" (solid, pour order 36): 115.97,96.395 115.97,94.432 115.97,83.426 113.779,81.236 104.839,81.236 104.839,96.395
GND on Bottom Layer "NONET_L-01_P-001" (solid, pour order 28): 115.509,67.516 115.509,65.553 115.509,54.547 113.319,52.356 104.378,52.356 104.378,67.516
GND_2 on Bottom Layer "NONET_L-01_P-001" (solid, pour order 25): 141.042,0 167.65,0 167.625,33.557 141.025,33.557
GND on Bottom Layer "NONET_L-01_P-001" (solid, pour order 21): 0.106,137.4 31.15,137.4 39.425,129.125 39.425,111.7 54.475,96.65 54.475,86.694 82.525,58.644 82.525,49.75 91.333,40.942 137.875,40.942 137.875,-0.1 19.45,-0.1 0.001,19.349
GND on Bottom Layer "NONET_L-01_P-001" (solid, pour order 23): 172.048,33.547 172.048,14.075 200.1,14.075 200.1,33.547
GND on Top Layer "NONET_L-01_P-001" (solid, pour order 29): 115.886,96.462 115.886,94.499 115.886,83.493 113.695,81.303 104.755,81.303 104.755,96.462
GND on Top Layer "NONET_L-01_P-001" (solid, pour order 35): 115.836,281.912 115.836,279.949 115.836,268.943 113.645,266.753 104.705,266.753 104.705,281.912
GND on Top Layer "NONET_L-01_P-001" (solid, pour order 34): 115.806,250.158 115.806,248.194 115.806,237.188 113.616,234.998 104.675,234.998 104.675,250.158
GND on Top Layer "NONET_L-01_P-001" (solid, pour order 33): 115.786,220.012 115.786,218.049 115.786,207.043 113.595,204.853 104.655,204.853 104.655,220.012
GND on Top Layer "NONET_L-01_P-001" (solid, pour order 32): 115.886,188.037 115.886,186.074 115.886,175.068 113.695,172.878 104.755,172.878 104.755,188.037
GND on Top Layer "NONET_L-01_P-001" (solid, pour order 31): 115.836,157.587 115.836,155.624 115.836,144.618 113.645,142.428 104.705,142.428 104.705,157.587
GND on Top Layer "NONET_L-01_P-001" (solid, pour order 30): 116.036,127.412 116.036,125.449 116.036,114.443 113.845,112.253 104.905,112.253 104.905,127.412
GND on Top Layer "NONET_L-01_P-001" (solid, pour order 27): 115.509,67.516 115.509,65.553 115.509,54.547 113.319,52.356 104.378,52.356 104.378,67.516
GND_2 on Top Layer "NONET_L-01_P-001" (solid, pour order 26): 141.011,0 167.65,0 167.625,33.557 140.994,33.557
GND on Top Layer "NONET_L-01_P-001" (solid, pour order 24): 172.048,27.56 172.048,14.075 200.1,14.075 200.1,33.547 172.048,33.547
GND on Top Layer "NONET_L-01_P-001" (solid, pour order 19): 0.106,137.4 31.15,137.4 39.425,129.125 39.425,111.7 54.475,96.65 54.475,86.694 82.525,58.644 82.525,49.75 91.333,40.942 137.875,40.942 137.875,-0.1 19.45,-0.1 0.001,19.349

## Keep-outs
Keep-Out Layer:
  circle w0.254: c195,5 r2
  circle w0.254: c5,5 r2
  circle w0.254: c195,285 r2
  circle w0.254: c5,145 r2
  circle w0.254: c195,145 r2
  circle w0.254: c5,285 r2
  lines w0.2: 118.023,186.721 118.023,176.124 ccw(c119.523,176.124) 121.023,176.124 121.023,186.723 ccw(c119.523,186.723) 118.023,186.723 ; 118.03,216.74 118.03,206.144 ccw(c119.53,206.144) 121.03,206.144 121.03,216.743 ccw(c119.53,216.743) 118.03,216.743 ; 118.094,65.402 118.094,54.806 ccw(c119.594,54.806) 121.094,54.806 121.094,65.405 ccw(c119.594,65.405) 118.094,65.405 ; 118.23,279.529 118.23,268.933 ccw(c119.73,268.933) 121.23,268.933 121.23,279.532 ccw(c119.73,279.532) 118.23,279.532 ; 118.234,93.552 118.234,82.956 ccw(c119.734,82.956) 121.234,82.956 121.234,93.555 ccw(c119.734,93.555) 118.234,93.555 ; 118.292,249.014 118.292,238.418 ccw(c119.792,238.418) 121.292,238.418 121.292,249.017 ccw(c119.792,249.017) 118.292,249.017 ; 118.334,155.086 118.334,144.489 ccw(c119.834,144.489) 121.334,144.489 121.334,155.089 ccw(c119.834,155.089) 118.334,155.089 ; 118.585,125.64 118.585,115.044 ccw(c120.085,115.044) 121.585,115.044 121.585,125.643 ccw(c120.085,125.643) 118.585,125.643 ; 195,290 cw(c195,285) 200,285 200,5 cw(c195,5) 195,0 5,0 cw(c5,5) 0,5 0,285 cw(c5,285) 5,290 195.11,290

## Silkscreen, mask and mechanical layers (free items; w line width, h text height)
Top Overlay:
  circle w2: c5,5 r3
  circle w2: c195,5 r3
  circle w2: c195,285 r3
  circle w2: c5,145 r3
  circle w2: c195,145 r3
  circle w2: c5,285 r3
  rectangle: 164.818,161.199 184.818,168.199
  rectangle: 165,222.863 185,229.863
  rectangle: 164.964,99.555 184.964,106.555
  lines w0.2: 1.825,56.225 9.825,56.225 ; 1.825,61.225 9.825,61.225
  lines w0.5: 164.871,94.049 184.871,94.049 ; 164.921,79.929 184.921,79.929 ; 164.964,278.816 184.964,278.816 ; 165.031,64.439 185.031,64.439 ; 165.134,264.926 185.134,264.926 ; 165.147,217.257 185.147,217.257 ; 165.151,50.469 185.151,50.469 ; 165.197,203.137 185.197,203.137 ; 165.241,155.512 185.241,155.512 ; 165.244,249.436 185.244,249.436 ; 165.291,141.392 185.291,141.392 ; 165.307,187.647 185.307,187.647 ; 165.364,235.466 185.364,235.466 ; 165.401,125.902 185.401,125.902 ; 165.421,112.132 185.421,112.132 ; 165.427,173.677 185.427,173.677 ; 169.061,160.709 179.484,160.709 179.484,106.984 169.205,106.984 ; 169.256,99.144 179.834,99.144 179.834,45.265 169.555,45.265 ; 169.32,284.217 179.897,284.217 179.897,230.338 169.618,230.338 ; 169.478,222.333 179.83,222.333 179.83,168.679 169.551,168.679 ; 170.086,254.687 172.552,254.687 172.552,259.687 170.086,259.687 ; 170.109,192.998 172.575,192.998 172.575,197.998 170.109,197.998 ; 170.142,69.715 172.608,69.715 172.608,74.715 170.142,74.715 ; 170.182,131.404 172.648,131.404 172.648,136.404 170.182,136.404
  lines w1.5: 165.039,87.055 185.039,87.055 ; 165.177,271.953 185.177,271.953 ; 165.181,57.229 185.181,57.229 ; 165.24,210.164 185.24,210.164 ; 165.309,148.644 185.309,148.644 ; 165.394,242.501 185.394,242.501 ; 165.457,180.912 185.457,180.912 ; 165.576,119.142 185.576,119.142
  lines w3: 165.161,72.289 185.161,72.289 ; 165.374,257.286 185.374,257.286 ; 165.437,195.497 185.437,195.497 ; 165.531,133.877 185.531,133.877
  text "1_G" at 181.687,280.696 h2
  text "1_E" at 181.687,274.696 h2
  text "2_G" at 181.687,267.799 h2
  text "2_E" at 181.687,261.209 h2
  text "3_G" at 181.687,252.439 h2
  text "3_E" at 181.687,245.849 h2
  text "4_G" at 181.687,238.109 h2
  text "4_E" at 181.687,231.519 h2
  text "5_G" at 181.687,219.497 h2
  text "5_E" at 181.687,212.907 h2
  text "6_G" at 181.687,206.01 h2
  text "6_E" at 181.687,199.42 h2
  text "7_G" at 181.687,190.65 h2
  text "7_E" at 181.687,184.06 h2
  text "8_G" at 181.687,176.32 h2
  text "8_E" at 181.687,169.73 h2
  text "9_G" at 182.108,157.752 h2
  text "9_E" at 182.108,151.162 h2
  text "10_G" at 182.108,144.265 h2
  text "10_E" at 182.108,137.675 h2
  text "GND VCC" at 3.054,128.996 h1.2 r270
  text "11_G" at 182.108,128.905 h2
  text "11_E" at 182.108,122.315 h2
  text "12_G" at 182.108,114.575 h2
  text "12_E" at 182.108,107.985 h2
  text "13_G" at 182.108,96.289 h2
  text "13_E" at 182.108,89.699 h2
  text "14_G" at 182.108,82.801 h2
  text "14_E" at 182.108,76.211 h2
  text "5V" at 48.588,70.886 h0.8 r90
  text "V3V" at 51.151,70.886 h0.8 r90
  text "SDA" at 53.668,70.886 h0.8 r90
  text "SCL" at 55.974,70.886 h0.8 r90
  text "GND" at 58.698,70.886 h0.8 r90
  text "5V" at 18.715,68.355 h0.8
  text "15_G" at 182.108,67.441 h2
  text "5V" at 67.361,67.286 h0.8
  text "J48" at 12.554,67.079 h0.8 r90
  text "CS" at 18.586,65.636 h0.8
  text "SDA" at 66.801,65.165 h0.8
  text "SCK" at 17.986,63.211 h0.8
  text "SCL" at 66.85,63.165 h0.8
  text "J53" at 12.554,62.335 h0.8 r90
  text "GND" at 3.224,61.954 h0.8 r90
  text "DIR" at 4.574,61.954 h0.8 r90
  text "RX" at 6.024,61.954 h0.8 r90
  text "TX" at 7.416,61.954 h0.8 r90
  text "5V" at 8.771,61.954 h0.8 r90
  text "V3V" at 10.004,61.954 h0.8 r90
  text "GND" at 66.801,61.165 h0.8
  text "15_E" at 182.108,60.851 h2
  text "MISO" at 17.336,60.711 h0.8
  text "MOSI" at 17.261,58.061 h0.8
  text "GND" at 3.249,56.956 h0.8 r90
  text "LED_3" at 4.466,56.956 h0.8 r90
  text "LED_2" at 5.916,56.956 h0.8 r90
  text "LED_1" at 7.308,56.956 h0.8 r90
  text "5V" at 8.796,56.956 h0.8 r90
  text "V3V" at 10.029,56.956 h0.8 r90
  text "GND" at 17.876,55.395 h0.8
  text "GND" at 67.336,54.636 h0.8
  text "J52" at 12.554,53.77 h0.8 r90
  text "16_G" at 182.108,53.111 h2
  text "GND" at 2.924,52.679 h0.8 r90
  text "RX" at 4.274,52.679 h0.8 r90
  text "TX" at 5.724,52.679 h0.8 r90
  text "CLK" at 7.116,52.679 h0.8 r90
  text "DIO" at 8.471,52.679 h0.8 r90
  text "V3V" at 9.704,52.679 h0.8 r90
  text "TIM1" at 67.125,52.175 h0.8
  text "5V" at 67.125,49.385 h0.8
  text "16_E" at 182.108,46.521 h2
  text "GND" at 26.231,45.934 h0.8
  text "GND" at 67.586,45.836 h0.8
  text "5V" at 79.986,45.836 h0.8
  text "TIM2" at 67.226,43.345 h0.8
  text "DC/RS" at 26.325,43.302 h0.8
  text "SENS_1" at 79.284,43.287 h0.8
  text "D_RST" at 26.325,40.896 h0.8
  text "GND" at 79.463,40.712 h0.8
  text "5V" at 66.972,40.214 h0.8
  text "D_LED" at 26.325,38.211 h0.8
  text "GND" at 67.511,36.986 h0.8
  text "5V" at 80.036,36.961 h0.8
  text "D_INT" at 26.701,35.455 h0.8
  text "GND" at 194.029,35.104 h0.8
  text "SENS_2" at 79.284,34.692 h0.8
  text "HALL_A" at 66.622,34.439 h0.8
  text "OUT_P1" at 193.954,33.662 h0.8
  text "5V" at 26.701,33.501 h0.8
  text "OUT_N1" at 193.954,32.237 h0.8
  text "GND" at 79.513,31.837 h0.8
  text "5V" at 66.875,31.757 h0.8
  text "5V" at 194.054,30.854 h0.8
  text "5V" at 80.111,28.336 h0.8
  text "GND" at 67.486,28.261 h0.8
  text "HALL_B" at 66.672,25.664 h0.8
  text "SENS_3" at 79.634,25.569 h0.8
  text "GND" at 79.588,23.212 h0.8
  text "5V" at 66.66,22.705 h0.8
  text "GND" at 42.115,20.939 h0.8 r90
  text "V3V" at 29.098,20.886 h0.8 r90
  text "LED_4" at 39.125,20.885 h0.8 r90
  text "V3V" at 15.478,20.84 h0.8 r90
  text "LED_5" at 36.719,20.814 h0.8 r90
  text "LED_7" at 31.554,20.715 h0.8 r90
  text "LED_6" at 34.094,20.715 h0.8 r90
  text "DIO" at 12.879,20.586 h0.8 r90
  text "GND" at 66.485,20.446 h0.8
  text "GND" at 7.753,20.386 h0.8 r90
  text "CLK" at 10.221,20.386 h0.8 r90
  text "5V" at 80.161,19.536 h0.8
  text "SENS_4" at 79.713,16.887 h0.8
  text "HALL_C" at 66.603,16.777 h0.8
  text "GND" at 79.713,14.112 h0.8
  text "5V" at 66.485,13.98 h0.8
  text "GND" at 46.278,11.461 h0.8 r90
  text "UI_INT" at 49.22,8.811 h0.8 r90
  text "B" at 166.729,2.954 h1.52
  text "G" at 169.804,2.954 h1.52
  text "A" at 172.804,2.954 h1.52

## Text inside footprints (layer, text, board x,y; h text height)
C47: Top Overlay "-" at 23.999,123.606 h1.52 r270; Top Overlay "+" at 23.999,130.337 h1.52 r270
P10: Top Overlay "1" at 58.492,66.132 h1.02
U1: Top Overlay "-18V_1" at 63.859,146.875 h1.3 r270; Top Overlay "-18V_1" at 66.399,146.875 h1.3 r270; Top Overlay "+18V_1" at 68.939,146.875 h1.3 r270; Top Overlay "+18V_1" at 71.479,146.875 h1.3 r270; Top Overlay "+18V_2" at 28.3,147.154 h1.3 r270; Top Overlay "+18V_2" at 30.84,147.154 h1.3 r270; Top Overlay "-18V_2" at 33.38,147.154 h1.3 r270; Top Overlay "-18V_2" at 35.92,147.154 h1.3 r270; Top Overlay "+12V" at 53.266,146.058 h1.3 r270; Top Overlay "GND" at 45.647,145.418 h1.3 r270; Top Overlay "GND" at 48.187,145.418 h1.3 r270; Top Overlay "+12V" at 50.726,146.058 h1.3 r270; Bottom Overlay "+18V_2" at 28.3,140.388 h1.3 r270; Bottom Overlay "+18V_2" at 30.84,140.388 h1.3 r270; Bottom Overlay "-18V_2" at 33.38,140.388 h1.3 r270; Bottom Overlay "-18V_2" at 35.92,140.389 h1.3 r270; Bottom Overlay "GND" at 45.647,142.124 h1.3 r270; Bottom Overlay "GND" at 48.187,142.124 h1.3 r270; Bottom Overlay "+12V" at 50.726,141.484 h1.3 r270; Bottom Overlay "+12V" at 53.266,141.484 h1.3 r270; Bottom Overlay "-18V_1" at 63.859,140.667 h1.3 r270; Bottom Overlay "-18V_1" at 66.399,140.667 h1.3 r270; Bottom Overlay "+18V_1" at 68.939,140.667 h1.3 r270; Bottom Overlay "+18V_1" at 71.479,140.667 h1.3 r270
U6: Top Overlay "+12V" at 50.836,272.058 h1.3 r270; Top Overlay "GND" at 48.297,271.418 h1.3 r270; Top Overlay "GND" at 45.757,271.418 h1.3 r270; Top Overlay "+12V" at 53.376,272.058 h1.3 r270; Top Overlay "-18V_2" at 36.03,273.154 h1.3 r270; Top Overlay "-18V_2" at 33.49,273.154 h1.3 r270; Top Overlay "+18V_2" at 30.95,273.154 h1.3 r270; Top Overlay "+18V_2" at 28.41,273.154 h1.3 r270; Top Overlay "+18V_1" at 71.589,272.875 h1.3 r270; Top Overlay "+18V_1" at 69.049,272.875 h1.3 r270; Top Overlay "-18V_1" at 66.509,272.875 h1.3 r270; Top Overlay "-18V_1" at 63.969,272.875 h1.3 r270; Bottom Overlay "+18V_1" at 71.589,266.667 h1.3 r270; Bottom Overlay "+18V_1" at 69.049,266.667 h1.3 r270; Bottom Overlay "-18V_1" at 66.509,266.667 h1.3 r270; Bottom Overlay "-18V_1" at 63.969,266.667 h1.3 r270; Bottom Overlay "+12V" at 53.376,267.484 h1.3 r270; Bottom Overlay "+12V" at 50.836,267.484 h1.3 r270; Bottom Overlay "GND" at 48.297,268.124 h1.3 r270; Bottom Overlay "GND" at 45.757,268.124 h1.3 r270; Bottom Overlay "-18V_2" at 36.03,266.389 h1.3 r270; Bottom Overlay "-18V_2" at 33.49,266.388 h1.3 r270; Bottom Overlay "+18V_2" at 30.95,266.388 h1.3 r270; Bottom Overlay "+18V_2" at 28.41,266.388 h1.3 r270
U8: Top Overlay "-18V_1" at 63.949,222.875 h1.3 r270; Top Overlay "-18V_1" at 66.489,222.875 h1.3 r270; Top Overlay "+18V_1" at 69.029,222.875 h1.3 r270; Top Overlay "+18V_1" at 71.569,222.875 h1.3 r270; Top Overlay "+18V_2" at 28.39,223.154 h1.3 r270; Top Overlay "+18V_2" at 30.93,223.154 h1.3 r270; Top Overlay "-18V_2" at 33.47,223.154 h1.3 r270; Top Overlay "-18V_2" at 36.01,223.154 h1.3 r270; Top Overlay "+12V" at 53.356,222.058 h1.3 r270; Top Overlay "GND" at 45.737,221.418 h1.3 r270; Top Overlay "GND" at 48.277,221.418 h1.3 r270; Top Overlay "+12V" at 50.816,222.058 h1.3 r270; Bottom Overlay "+18V_2" at 28.39,216.388 h1.3 r270; Bottom Overlay "+18V_2" at 30.93,216.388 h1.3 r270; Bottom Overlay "-18V_2" at 33.47,216.388 h1.3 r270; Bottom Overlay "-18V_2" at 36.01,216.389 h1.3 r270; Bottom Overlay "GND" at 45.737,218.124 h1.3 r270; Bottom Overlay "GND" at 48.277,218.124 h1.3 r270; Bottom Overlay "+12V" at 50.816,217.484 h1.3 r270; Bottom Overlay "+12V" at 53.356,217.484 h1.3 r270; Bottom Overlay "-18V_1" at 63.949,216.667 h1.3 r270; Bottom Overlay "-18V_1" at 66.489,216.667 h1.3 r270; Bottom Overlay "+18V_1" at 69.029,216.667 h1.3 r270; Bottom Overlay "+18V_1" at 71.569,216.667 h1.3 r270
U10: Top Overlay "+12V" at 50.746,246.058 h1.3 r270; Top Overlay "GND" at 48.207,245.418 h1.3 r270; Top Overlay "GND" at 45.667,245.418 h1.3 r270; Top Overlay "+12V" at 53.286,246.058 h1.3 r270; Top Overlay "-18V_2" at 35.94,247.154 h1.3 r270; Top Overlay "-18V_2" at 33.4,247.154 h1.3 r270; Top Overlay "+18V_2" at 30.86,247.154 h1.3 r270; Top Overlay "+18V_2" at 28.32,247.154 h1.3 r270; Top Overlay "+18V_1" at 71.499,246.875 h1.3 r270; Top Overlay "+18V_1" at 68.959,246.875 h1.3 r270; Top Overlay "-18V_1" at 66.419,246.875 h1.3 r270; Top Overlay "-18V_1" at 63.879,246.875 h1.3 r270; Bottom Overlay "+18V_1" at 71.499,240.667 h1.3 r270; Bottom Overlay "+18V_1" at 68.959,240.667 h1.3 r270; Bottom Overlay "-18V_1" at 66.419,240.667 h1.3 r270; Bottom Overlay "-18V_1" at 63.879,240.667 h1.3 r270; Bottom Overlay "+12V" at 53.286,241.484 h1.3 r270; Bottom Overlay "+12V" at 50.746,241.484 h1.3 r270; Bottom Overlay "GND" at 48.207,242.124 h1.3 r270; Bottom Overlay "GND" at 45.667,242.124 h1.3 r270; Bottom Overlay "-18V_2" at 35.94,240.389 h1.3 r270; Bottom Overlay "-18V_2" at 33.4,240.388 h1.3 r270; Bottom Overlay "+18V_2" at 30.86,240.388 h1.3 r270; Bottom Overlay "+18V_2" at 28.32,240.388 h1.3 r270
U41: Top Overlay "-18V_1" at 63.908,172.875 h1.3 r270; Top Overlay "-18V_1" at 66.448,172.875 h1.3 r270; Top Overlay "+18V_1" at 68.988,172.875 h1.3 r270; Top Overlay "+18V_1" at 71.528,172.875 h1.3 r270; Top Overlay "+18V_2" at 28.35,173.154 h1.3 r270; Top Overlay "+18V_2" at 30.89,173.154 h1.3 r270; Top Overlay "-18V_2" at 33.43,173.154 h1.3 r270; Top Overlay "-18V_2" at 35.97,173.154 h1.3 r270; Top Overlay "+12V" at 53.315,172.058 h1.3 r270; Top Overlay "GND" at 45.697,171.418 h1.3 r270; Top Overlay "GND" at 48.237,171.418 h1.3 r270; Top Overlay "+12V" at 50.775,172.058 h1.3 r270; Bottom Overlay "+18V_2" at 28.35,166.388 h1.3 r270; Bottom Overlay "+18V_2" at 30.89,166.388 h1.3 r270; Bottom Overlay "-18V_2" at 33.43,166.388 h1.3 r270; Bottom Overlay "-18V_2" at 35.97,166.389 h1.3 r270; Bottom Overlay "GND" at 45.697,168.124 h1.3 r270; Bottom Overlay "GND" at 48.237,168.124 h1.3 r270; Bottom Overlay "+12V" at 50.775,167.484 h1.3 r270; Bottom Overlay "+12V" at 53.315,167.484 h1.3 r270; Bottom Overlay "-18V_1" at 63.908,166.667 h1.3 r270; Bottom Overlay "-18V_1" at 66.448,166.667 h1.3 r270; Bottom Overlay "+18V_1" at 68.988,166.667 h1.3 r270; Bottom Overlay "+18V_1" at 71.528,166.667 h1.3 r270